# Altium PCB Tracker-NB-IOT-v1.1.PcbDoc (part 1 of 3)
Units mm, origin at the board's own origin, x right, y up, seen from the top; angles counter-clockwise.
Board outline 60 x 36.48 mm, 4 copper layers (Top Layer, Mid Layer 1, Mid Layer 2, Bottom Layer), stack 1.514 mm thick; 117 components, 86 nets, 443 pads, 352 vias.
Unrouted connection lines stored in the file: 3.
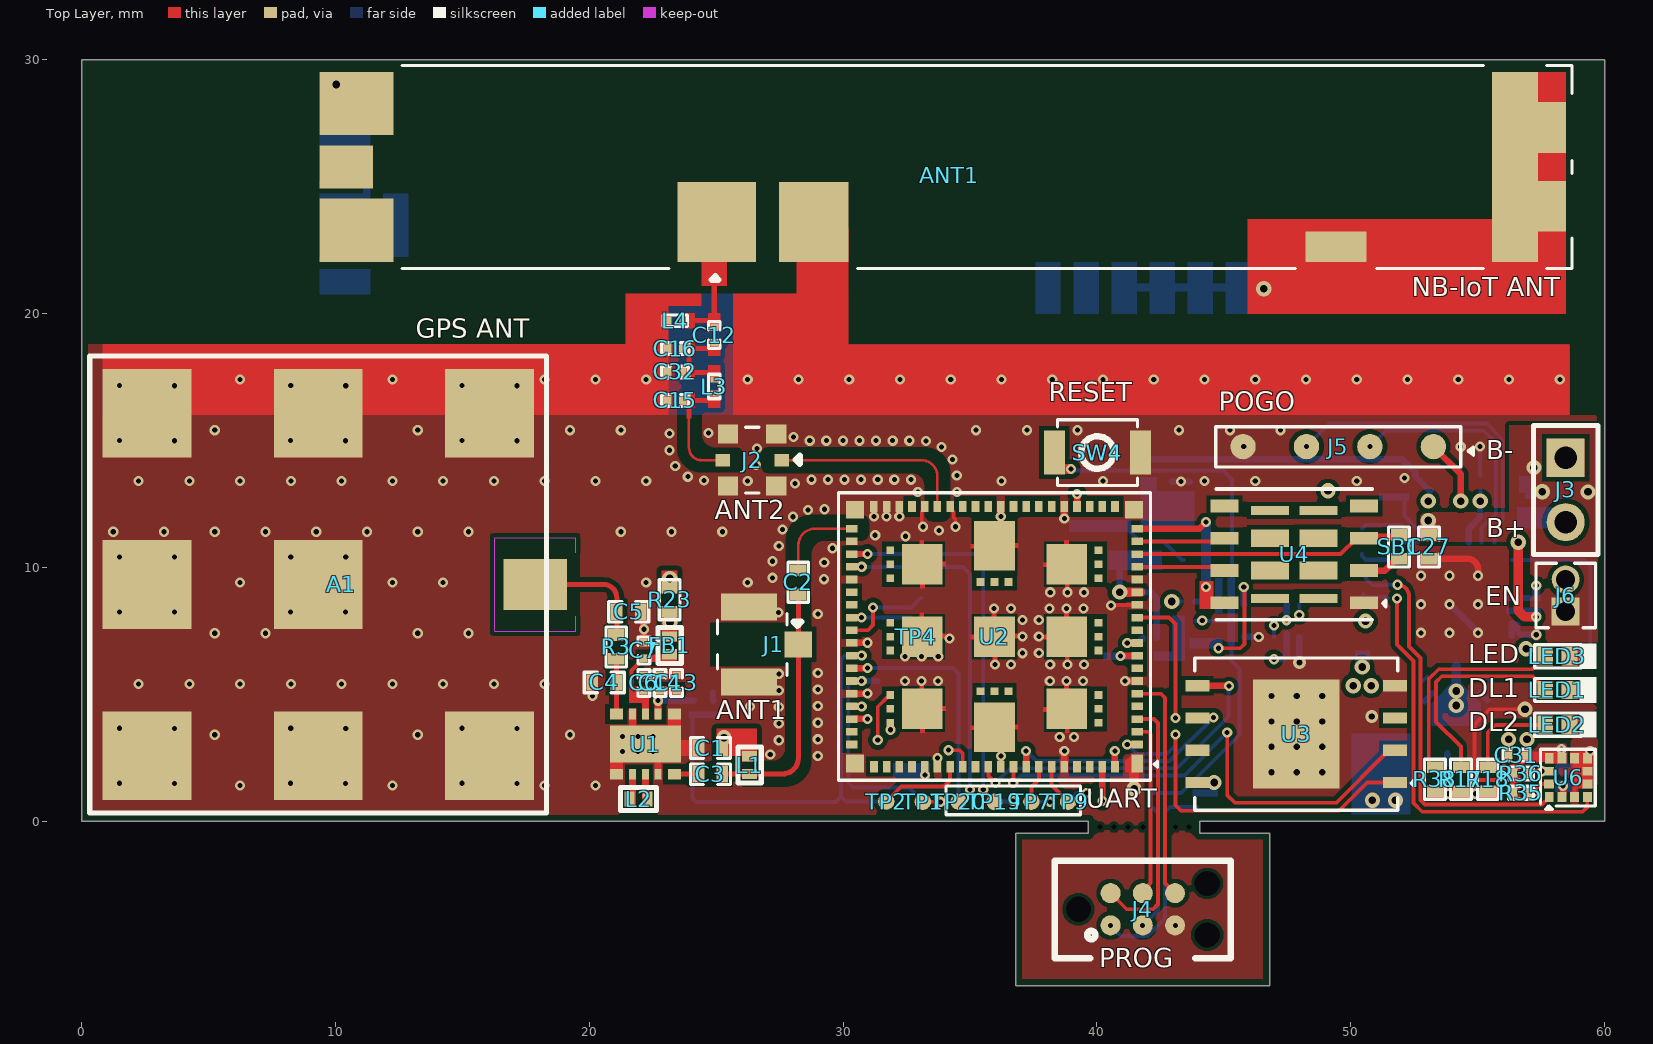
[diagram p0: Top Layer view]
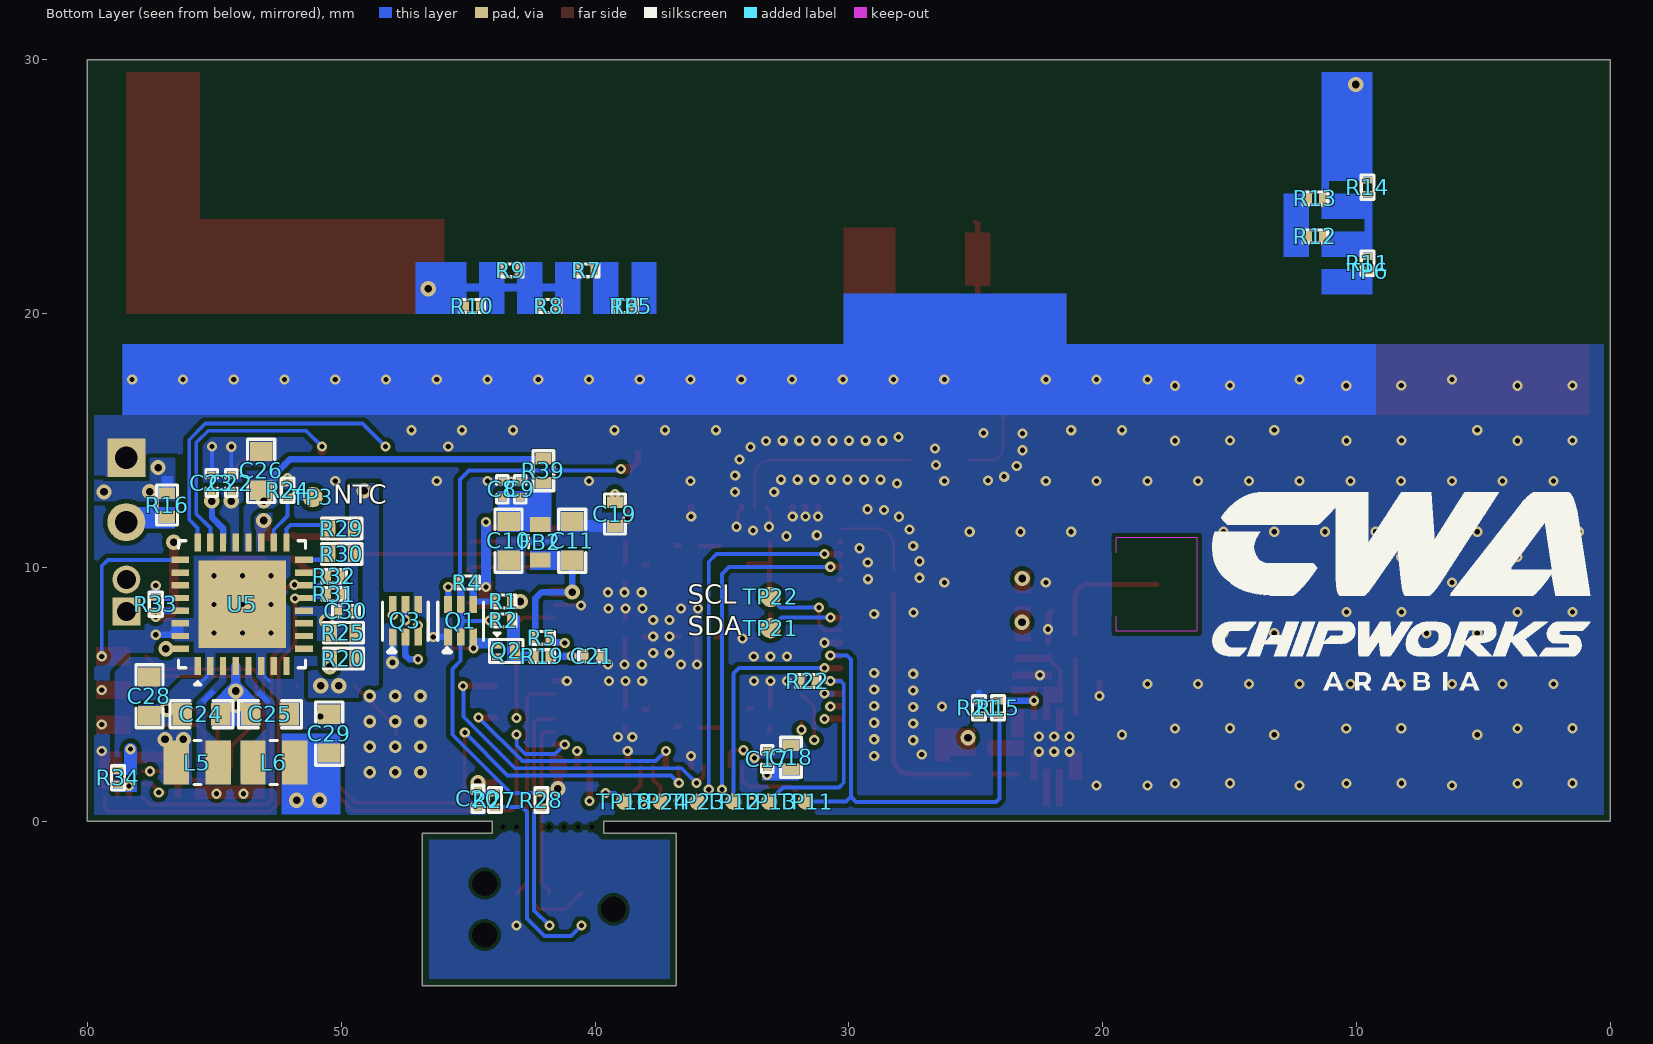
[diagram p1: Bottom Layer view, seen from below]
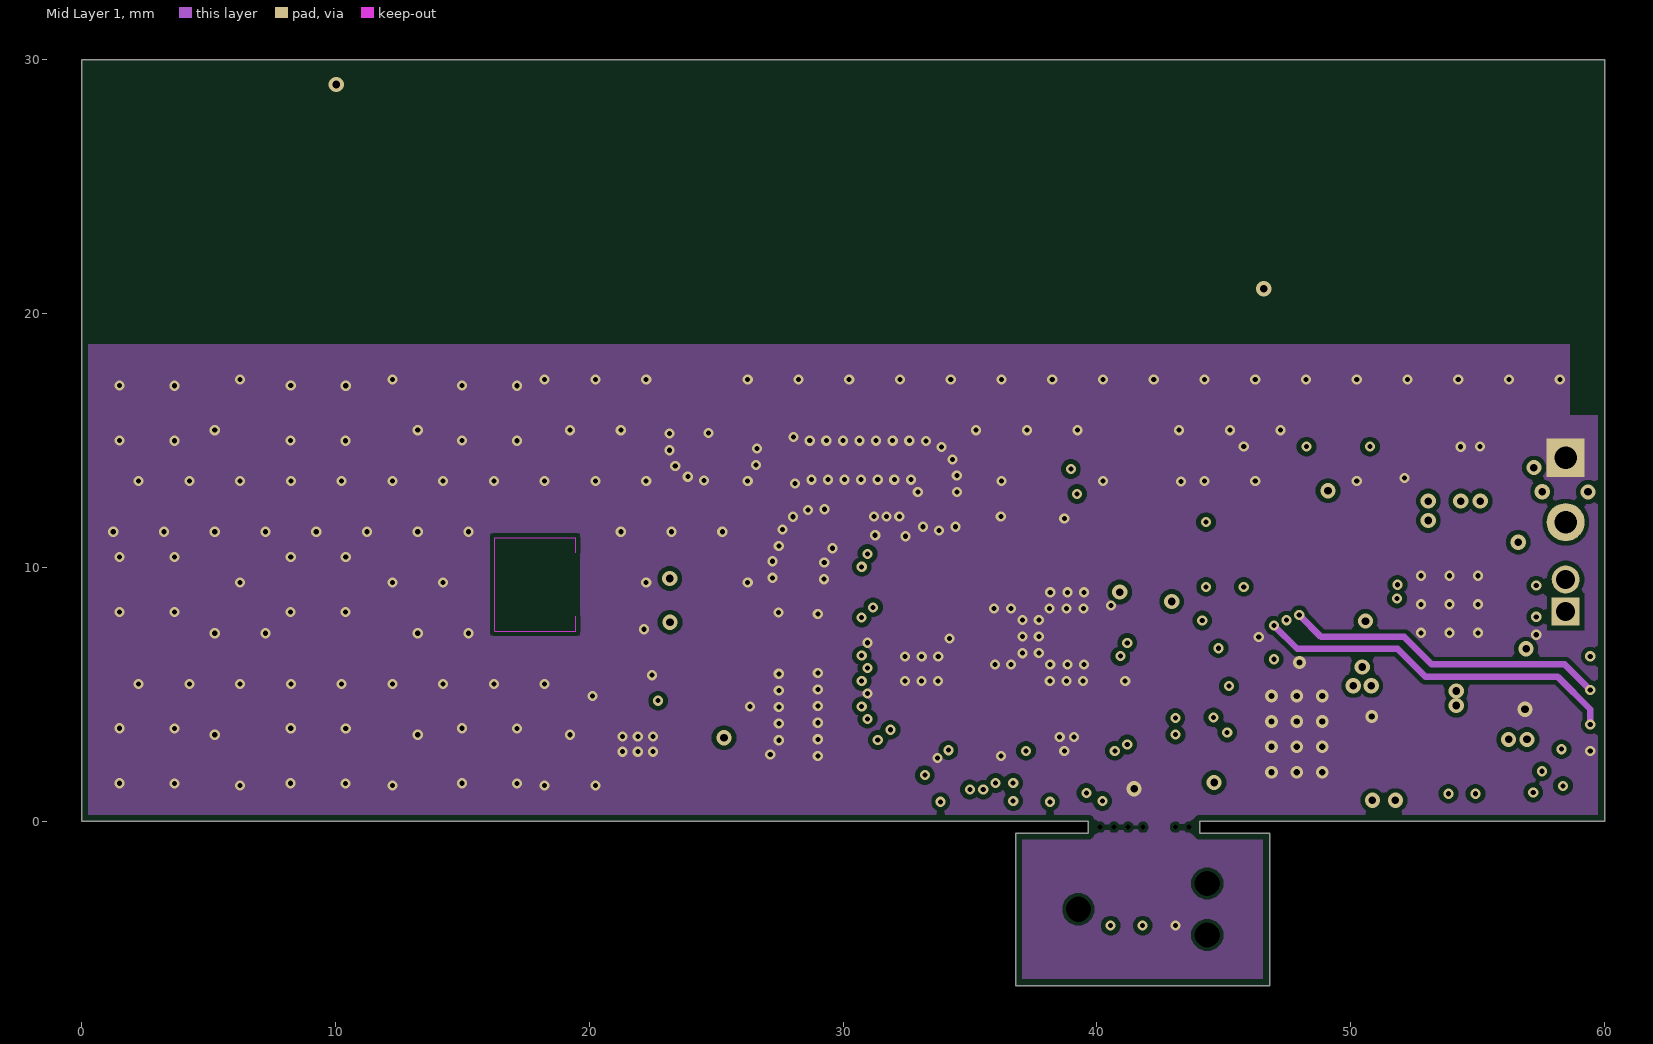
[diagram p2: Mid Layer 1]
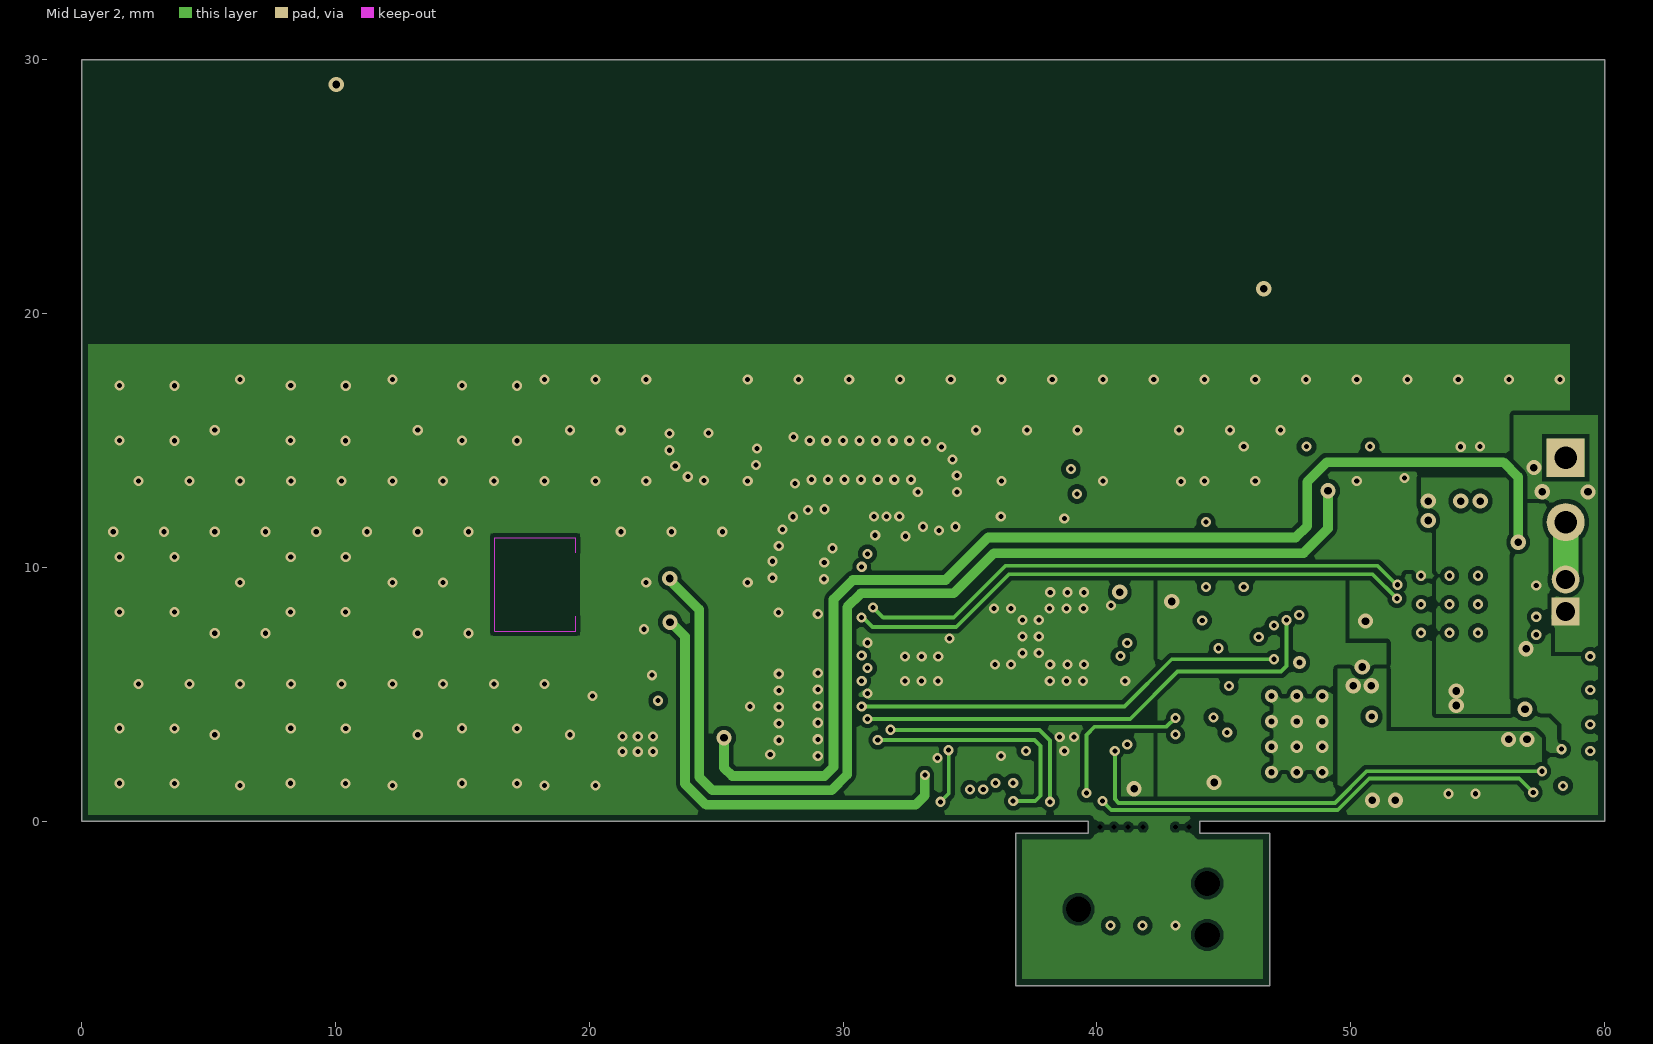
[diagram p3: Mid Layer 2]
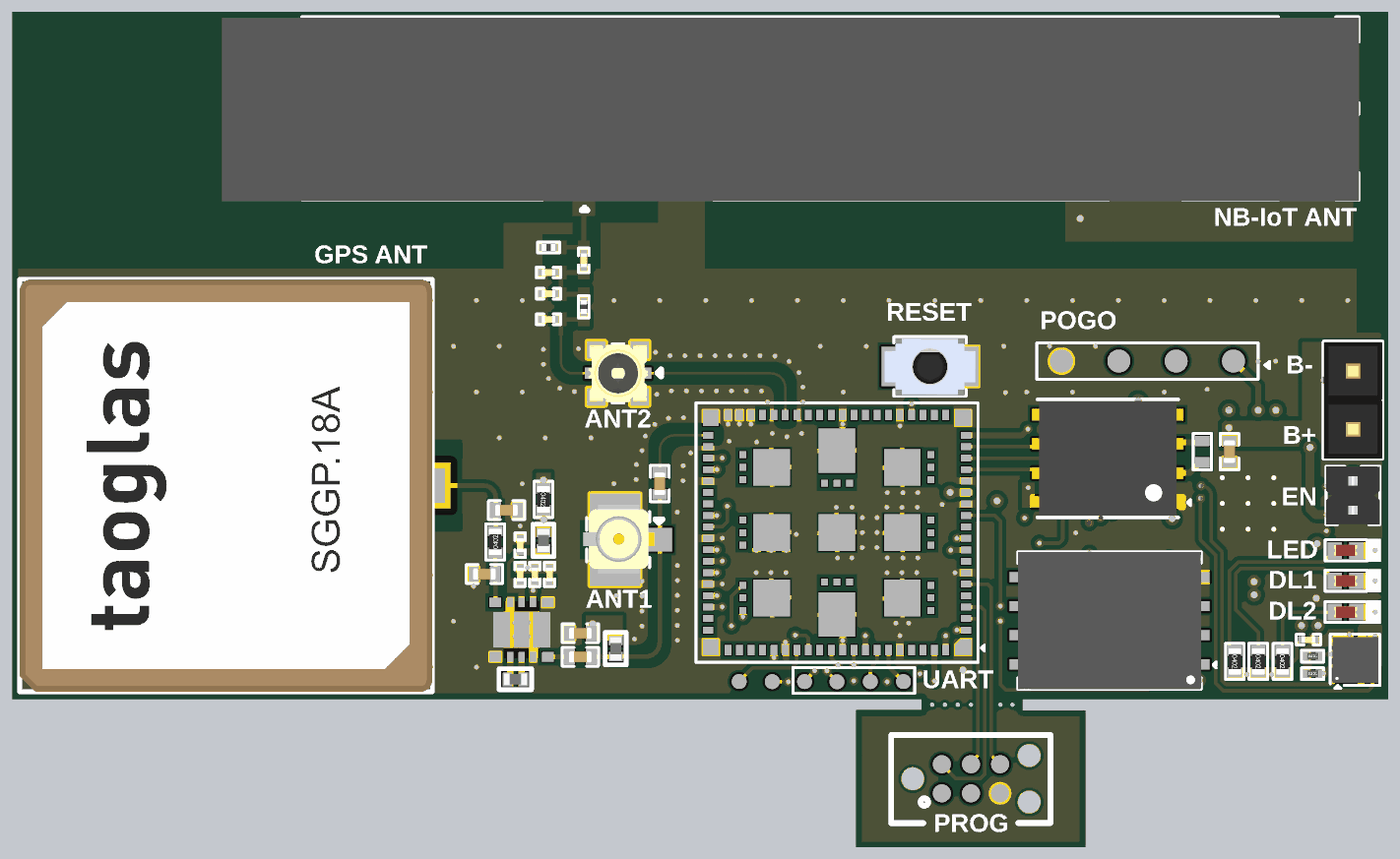
[diagram p5: 3D render of the assembled board from above, using the file's embedded part models]
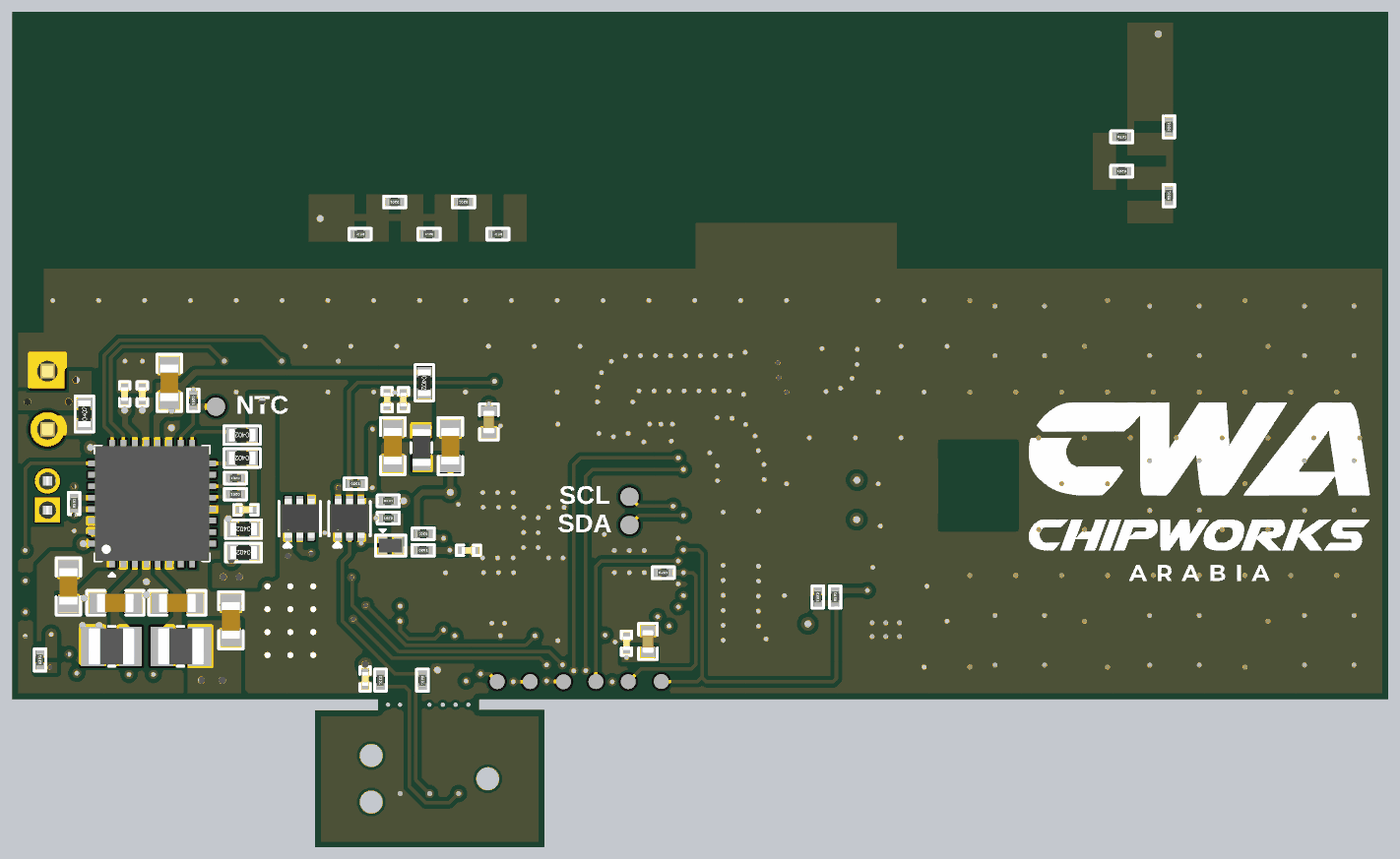
[diagram p6: 3D render of the assembled board from below, using the file's embedded part models]

## Layer stack, top to bottom
Top Solder: solder mask 0.05, Solder Resist, Dk 3.5
Top Layer: signal copper 0.035
Dielectric 2: prepreg 0.072, PP-006, Dk 4.1
Mid Layer 1: signal copper 0.035
Dielectric 1: dielectric 1.23, FR-4, Dk 4.8
Mid Layer 2: signal copper 0.035
Dielectric 3: prepreg 0.072, PP-006, Dk 4.1
Bottom Layer: signal copper 0.035
Bottom Solder: solder mask 0.05, Solder Resist, Dk 3.5

## Board outline
36.801,-6.477 36.801,-0.476 39.657,-0.476 39.657,0.002 0,0.002 0,30 60,30 60,0 44.055,0 44.055,-0.478 46.801,-0.478 46.801,-6.477

## Design rules (kind name [scope] priority, off if disabled: settings)
BoardOutlineClearance [All] p1: gap=0 ignorepadtopadclearanceinfootprint=FALSE except(0.254: Poly-OutlineEdge)
Clearance [All] p1: gap=0.127 ignorepadtopadclearanceinfootprint=FALSE except(0.178: Arc-Poly Track-Poly SMDPad-Poly THPad-Poly Via-Poly Fill-Poly Poly-Poly)
ComponentClearance [All] p1: gap=0 collisioncheckmode=3 verticalgap=0 showdistances=FALSE
MinimumSolderMaskSliver [All] p1: minsoldermaskwidth=0
PolygonConnect [All] p1: connectstyle=Direct reliefconductorwidth=0.254 reliefentries=4 polygonreliefangle="90 Angle" airgapwidth=0.254
RoutingVias [All] p1: holewidth=0.3 width=0.6 viastyle="Through Hole" minholewidth=0.2 minwidth=0.4 maxholewidth=0.3 maxwidth=0.6
ShortCircuit "R6 and R11 Voilation" [InComponent('R6')or InComponent('R11')] p1: allowed=TRUE
ShortCircuit [All] p2: allowed=FALSE
SilkToSilkClearance [All] p1: silktosilkclearance=0.127
SilkToSolderMaskClearance [IsPad] p1: minsilkscreentomaskgap=0 clearancetoexposedcopper=TRUE
SolderMaskExpansion [All] p1: expansion=0.102 istentingtop=FALSE soldermaskfromhole=TRUE
SupplyNets "Schematic Supply Nets_11" [InNet('VSYS')] p1: voltage=0.000
SupplyNets "Schematic Supply Nets_10" [InNet('VUSB')] p2: voltage=0.000
SupplyNets "Schematic Supply Nets_9" [InNet('VDD_IMCU')] p3: voltage=0.000
SupplyNets "Schematic Supply Nets_8" [InNet('VDD_1V8')] p4: voltage=0.000
SupplyNets "Schematic Supply Nets_7" [InNet('VDD_3V0')] p5: voltage=0.000
SupplyNets "Schematic Supply Nets_6" [InNet('VBUS')] p6: voltage=0.000
SupplyNets "Schematic Supply Nets_5" [InNet('VDD_GPIO')] p7: voltage=0.000
SupplyNets "Schematic Supply Nets_4" [InNet('GND')] p8: voltage=0.000
SupplyNets "Schematic Supply Nets_3" [InNet('VDD')] p9: voltage=0.000
SupplyNets "Schematic Supply Nets_2" [InNet('VDD_GNSS')] p10: voltage=0.000
SupplyNets "Schematic Supply Nets_1" [InNet('VDD_nRF')] p11: voltage=0.000
SupplyNets "Schematic Supply Nets" [InNet('VBAT')] p12: voltage=0.000
UnRoutedNet [All] p1: checkbadconnections=TRUE
Width RF_Lines [InNet('ANT') or InNet('LTE_RF1') or InNet('GPS_RF1')] p1: maxlimit=0.101 minlimit=0.077 preferedwidth=0.101 toplayer_minwidth=0.101 midlayer1_maxwidth=0.077 midlayer1_prefwidth=0.077 midlayer2_maxwidth=0.077 midlayer2_prefwidth=0.077 bottomlayer_minwidth=0.101 impedanceprofiledriven=TRUE impedanceprofileid={30CA258E-08FE-4689-83D6-7ECBA6ABAF34} impedanceprofilevalue=50.000000 minimp=50.000000 maximp=50.000000 favimp=50.000000
Width [All] p2: maxlimit=1.27 minlimit=0.152 preferedwidth=0.254 minimp=50.000000 maximp=50.000000 favimp=50.000000
24 further rules are at their usual default settings.

## Classes and differential pairs
net class RF_Lines: ANT GPS_RF1 GPS_RF2 GPS_RF3 GPS_RF4 GPS_RF5 LTE_RF1 NetANT1_1 NetC12_1

## Components (designator, comment, footprint, x,y, rotation, side; value= is the part's Value field where it differs from the comment)
A1 "DSGP.1575.18.4.A.02" DSGP.1575.18.4.A.02 17.864,9.326 r0 top
ANT1 "P822601" P822601 34.174,25.454 r0 top
C1 "39pF" Cap-0402 24.771,2.881 r0 top
C2 "39pF" Cap-0402 28.232,9.412 r270 top
C3 "39pF" Cap-0402 24.771,1.85 r0 top
C4 "DNP" Cap-0402 20.587,5.466 r180 top
C5 "DNP" Cap-0402 21.552,8.254 r0 top
C6 "100pF" CAP-0201 22.146,5.447 r270 top
C7 "100nF" CAP-0201 22.146,6.727 r270 top
C8 "1uF" CAP-0201 43.659,13.073 r270 bottom
C9 "1uF" CAP-0201 42.948,13.073 r270 bottom
C10 "10uF" Cap-0603 43.409,11.049 r90 bottom
C11 "10uF" Cap-0603 40.898,11.049 r270 bottom
C12 "3.5pF" CAP-0201 24.919,19.155 r90 top
C13 "100nF" CAP-0201 23.427,5.447 r270 top
C14 "100pF" CAP-0201 22.784,5.447 r270 top
C15 "DNP" CAP-0201 23.386,16.58 r0 top
C16 "DNP" CAP-0201 23.386,18.624 r0 top
C17 "100nF" CAP-0201 33.214,2.446 r270 bottom
C18 "4.7uF" Cap-0402 32.278,2.522 r270 bottom
C19 "4.7uF" Cap-0402 39.218,12.102 r90 bottom
C20 "100nF" CAP-0201 44.615,0.884 r90 bottom
C21 "100nF" CAP-0201 40.11,6.496 r0 bottom
C22 "1uF" CAP-0201 54.336,13.324 r270 bottom
C23 "1uF" CAP-0201 55.107,13.324 r270 bottom
C24 "10uF" Cap-0603 55.509,4.21 r180 bottom
C25 "10uF" Cap-0603 52.808,4.21 r0 bottom
C26 "10uF" Cap-0603 53.158,13.806 r270 bottom
C27 "4.7uF" Cap-0402 53.084,10.805 r90 top
C28 "10uF" Cap-0603 57.559,4.921 r90 bottom
C29 "10uF" Cap-0603 50.472,3.448 r270 bottom
C30 "100nF" CAP-0201 49.816,8.27 r0 bottom
C31 "100nF" CAP-0201 56.531,2.603 r0 top
C32 "DNP" CAP-0201 23.386,17.7 r0 top
FB1 "BLM15EX121SN1D" IND-0402 23.162,6.927 r90 top
FB2 "BLM18SD220SN1D" "IND-0603 (1608 Metric)" 42.16,10.987 r270 bottom
J1 "U.FL-R-SMT-1(80)" U.FL-R-SMT-1(80)_ 27.258,6.964 r90 top
J2 "MM8130-2600RA2" MM8130-2600RA2 26.416,14.224 r90 top
J3 "X6511WV-02H-C60D30" HDR1X2_ 58.471,14.321 r270 top
J4 "TC2030-IDC-NL" TC2030-IDC-NL_ 41.808,-3.471 r0 top
J5 "POGO Connector 4 Pin" "Pogo 4 Pin" 49.507,14.759 r180 top
J6 "1.27-1*2P" "HDR 1x2 Male 1.27mm" 58.471,8.89 r90 top
L1 "68nH" IND-0402 26.314,2.21 r90 top
L2 "9.1nH" IND-0402 21.936,0.873 r0 top
L3 "1.5nH" IND-0201 24.919,17.126 r90 top value=50mR
L4 "22nH" IND-0201 23.386,19.716 r0 top
L5 "2.2uH" IND-0806 55.679,2.31 r180 bottom
L6 "2.2uH" IND-0806 52.653,2.31 r0 bottom
LED1 "XZVG68W-2" LED-0402 58.143,5.169 r0 top
LED2 "RED" LED-0402 58.143,3.804 r0 top
LED3 "Red" LED-0402 58.143,6.496 r0 top
Q1 "DMC2400UV-7" SOT-563 45.296,7.891 r90 bottom
Q2 "RV2C010UNT2L" DFN1006-3 43.502,6.705 r270 bottom
Q3 "UM6X1NA-TP" SOT-563 47.47,7.891 r90 bottom locked
R1 "10K" Res-0201 43.605,8.656 r180 bottom
R2 "DNP" Res-0201 43.605,7.909 r0 bottom
R3 "0R" Res-0402 21.057,6.865 r90 top
R4 "100K" Res-0201 45.045,9.403 r180 bottom
R5 "10K" Res-0201 42.084,7.222 r0 bottom
R6 "0R" Res-0201 38.824,20.297 r0 bottom
R7 "0R" Res-0201 40.324,21.703 r0 bottom
R8 "0R" Res-0201 41.824,20.297 r0 bottom
R9 "0R" Res-0201 43.324,21.703 r0 bottom
R10 "0R" Res-0201 44.835,20.297 r0 bottom
R11 "0R" Res-0201 9.559,21.979 r90 bottom
R12 "0R" Res-0201 11.614,23.045 r0 bottom
R13 "0R" Res-0201 11.614,24.542 r180 bottom
R14 "0R" Res-0201 9.559,24.977 r90 bottom
R15 "1K" Res-0201 24.117,4.466 r90 bottom value=1kR
R16 "DNP" Res-0402 56.861,12.454 r90 bottom
R17 "120R" Res-0402 54.342,1.651 r270 top
R18 "120R" Res-0402 55.397,1.651 r270 top
R19 "1K" Res-0201 42.084,6.502 r180 bottom value=1kR
R20 "0R" Res-0402 49.918,6.404 r0 bottom
R21 "1M" Res-0201 24.873,4.466 r270 bottom value=1MR
R22 "1M" Res-0201 31.617,5.523 r180 bottom value=1MR
R23 "0R" Res-0402 23.162,8.724 r270 top
R24 "0R" Res-0201 52.112,13.044 r270 bottom
R25 "0R" Res-0402 49.918,7.424 r0 bottom
R27 "DNP" Res-0201 43.945,0.834 r270 bottom
R28 "0R" Res-0201 42.117,0.834 r270 bottom
R29 "47K" Res-0402 49.981,11.526 r0 bottom value=47kR
R30 "150K" Res-0402 49.981,10.524 r0 bottom
R31 "4.7K" Res-0201 50.274,8.948 r0 bottom
R32 "4.7K" Res-0201 50.274,9.651 r0 bottom
R33 "0R" Res-0201 57.309,8.545 r90 bottom
R34 "100K" Res-0201 58.795,1.716 r90 bottom
R35 "4.7K" Res-0201 56.709,1.117 r0 top
R36 "4.7K" Res-0201 56.709,1.878 r0 top
R38 "120R" Res-0402 53.318,1.651 r270 top
R39 "0R" Res-0402 42.033,13.81 r270 bottom
SB1 "Solder Bridge 0402" "Solder Bridge 0402" 51.9,10.805 r90 top
SW4 "B3U-1000P" B3U-1000P 40.022,14.525 r0 top
TP1 "TEST POINT 0.5mm Dia" "Test-point - 0.5mm"#1 33.14,0.768 r270 top
TP2 "TEST POINT 0.5mm Dia" "Test-point - 0.5mm"#1 31.698,0.773 r270 top
TP3 "TEST POINT 0.5mm Dia" "Test-point - 0.5mm"#2 51.123,12.769 r0 bottom
TP4 "TEST POINT 0.5mm Dia" "Test-point - 0.5mm"#2 32.863,7.269 r180 top
TP5 "TEST POINT 0.5mm Dia" "Test-point - 0.5mm"#3 34.028,24.685 r270 bottom
TP6 "TEST POINT 0.5mm Dia" "Test-point - 0.5mm"#4 39.87,24.685 r270 bottom
TP7 "TEST POINT 0.5mm Dia" "Test-point - 0.5mm"#1 37.418,0.771 r270 top
TP9 "TEST POINT 0.5mm Dia" "Test-point - 0.5mm"#1 38.864,0.772 r270 top
TP11 "TEST POINT 0.5mm Dia" "Test-point - 0.5mm"#1 31.698,0.773 r0 bottom
TP12 "TEST POINT 0.5mm Dia" "Test-point - 0.5mm"#1 34.55,0.771 r0 bottom
TP13 "TEST POINT 0.5mm Dia" "Test-point - 0.5mm"#1 33.14,0.768 r0 bottom
TP18 "TEST POINT 0.5mm Dia" "Test-point - 0.5mm"#1 38.852,0.768 r270 bottom
TP19 "TEST POINT 0.5mm Dia" "Test-point - 0.5mm"#1 35.963,0.762 r270 top
TP20 "TEST POINT 0.5mm Dia" "Test-point - 0.5mm"#1 34.55,0.771 r270 top
TP21 "TEST POINT 0.5mm Dia" "Test-point - 0.5mm"#2 33.084,7.602 r90 bottom
TP22 "TEST POINT 0.5mm Dia" "Test-point - 0.5mm"#2 33.084,8.835 r90 bottom
TP23 "TEST POINT 0.5mm Dia" "Test-point - 0.5mm"#1 35.963,0.762 r180 bottom
TP24 "TEST POINT 0.5mm Dia" "Test-point - 0.5mm"#1 37.418,0.771 r180 bottom
U1 "SKY65943-11" "10-MCM (2.5x2.5)" 22.208,3.038 r270 top
U2 "NRF9151-LACA-R" NRF9151-LACA-R 35.963,7.273 r180 top locked value=nRF9151-LACAA0A
U3 "GD25WB256EYIGY" "8-WSON (8x6)" 47.854,3.429 r180 top
U4 "MFFX-M2M UICC" MFFX 47.775,10.51 r180 top
U5 "NPM1300-QEAA-R" "32-QFN (5x5)" 53.908,8.545 r90 bottom locked
U6 "LIS2DH12TR" "12-LGA (2x2)" 58.572,1.718 r90 top

## Footprints (in the part's own frame and the unit in brackets; to place one, negate y for a bottom-side part, rotate by r counter-clockwise, add the part's x,y. Pads: shape width x height; smd on the part's side, far side on the other; paste and mask are expansions set on the pad)
"8-WSON (8x6)" [mm]
  rect 0.94x0.44 smd: 1(-3.895,1.905) 2(-3.895,0.635) 3(-3.895,-0.635) 4(-3.895,-1.905) 5(3.895,-1.905) 6(3.895,-0.635) 7(3.895,0.635) 8(3.895,1.905)
  rect 3.4x4.3 smd paste-3: 9(0,0)
  silkscreen extent -4.65,-3 4,3, body extent -4,-3 4,3, height 0.8
"10-MCM (2.5x2.5)" [mm]
  rect 0.425x0.515 smd mask+0.05: 1(-1.187,1.144) 5(-1.187,-1.144) 6(1.188,-1.144) 10(1.188,1.144)
  rect 0.425x0.275 smd mask+0.05: 2(-1.187,0.5) 3(-1.187,0) 4(-1.187,-0.5) 7(1.188,-0.5) 8(1.188,0) 9(1.188,0.5)
  rect 1.45x2.802 smd paste-2 mask-5: 11(0,0)
  rect 2.487x1.55 on Top Solder: ""(0,0)
  Top Layer region: -0.988,0.888 -0.713,0.888 -0.713,1.401 -0.988,1.401
  Top Layer region: 0.712,-1.399 0.987,-1.399 0.987,-0.887 0.712,-0.887
  Top Layer region: 0.712,0.363 0.987,0.363 0.987,0.638 0.712,0.638
  Top Layer region: -0.713,-0.362 -0.988,-0.362 -0.988,-0.637 -0.713,-0.637
  body extent -1.25,-1.25 1.25,1.25, height 0.7
"12-LGA (2x2)" [mm]
  rect 0.4x0.35 smd: 1(-0.76,0.75) 2(-0.76,0.25) 3(-0.76,-0.25) 4(-0.76,-0.75) 7(0.76,-0.75) 8(0.76,-0.25) 9(0.76,0.25) 10(0.76,0.75)
  rect 0.35x0.4 smd: 5(-0.25,-0.76) 6(0.25,-0.76) 11(0.25,0.76) 12(-0.25,0.76)
  silkscreen extent -1.24,-1.07 1.12,1.09, body extent -1,-1 1,1, height 0.7
"32-QFN (5x5)" [mm]
  rect 0.7x0.25 smd: 1(-2.435,1.75) 2(-2.435,1.25) 3(-2.435,0.75) 4(-2.435,0.25) 5(-2.435,-0.25) 6(-2.435,-0.75) 7(-2.435,-1.25) 8(-2.435,-1.75) 17(2.435,-1.75) 18(2.435,-1.25) 19(2.435,-0.75) 20(2.435,-0.25) 21(2.435,0.25) 22(2.435,0.75) 23(2.435,1.25) 24(2.435,1.75)
  rect 0.25x0.7 smd: 9(-1.75,-2.435) 10(-1.25,-2.435) 11(-0.75,-2.435) 12(-0.25,-2.435) 13(0.25,-2.435) 14(0.75,-2.435) 15(1.25,-2.435) 16(1.75,-2.435) 25(1.75,2.435) 26(1.25,2.435) 27(0.75,2.435) 28(0.25,2.435) 29(-0.25,2.435) 30(-0.75,2.435) 31(-1.25,2.435) 32(-1.75,2.435)
  rect 3.45x3.45 smd paste-3: 33(0,0)
  silkscreen extent -3.17,-2.5 2.5,2.5, body extent -2.5,-2.5 2.5,2.5, height 0.6
B3U-1000P [mm] "SWITCH TACTILE SPST-NO 0.05A 12V"
  rect 0.82x1.72 smd: 1(-1.7,0) 2(1.7,0)
  silkscreen extent -1.57,-1.3 1.57,1.3, body extent -2,-1.26 2,1.24, height 1.6
CAP-0201 [mm]
  rect 0.3x0.3 smd mask+0.055: 1(-0.3,0) 2(0.3,0)
  silkscreen extent -0.53,-0.23 0.53,0.23, body extent -0.3,-0.15 0.3,0.15, height 0.28
Cap-0402 [mil]
  rect 18x25 smd mask+2.36: 1(-18.5,0) 2(18.5,0)
  silkscreen extent -31,-16 31,16, body extent -20,-10 20,10, height 19
Cap-0603 [mil]
  rect 30x35 smd mask+2.36: 1(-30,0) 2(30,0)
  silkscreen extent -49,-21 49,21, body extent -32,-16 31,16, height 34
DFN1006-3 [mm]
  rect 0.25x0.4 smd: 1(-0.225,-0.35) 2(0.225,-0.35)
  rect 0.7x0.4 smd: 3(0,0.35)
  silkscreen extent -0.71,-0.66 0.46,0.66, body extent -0.3,-0.5 0.3,0.5, height 0.53
DSGP.1575.18.4.A.02 [mm]
  rect 2.5x2 smd paste-0.25 mask+0.3: 1(0,0)
  rect 3.5x3.5 smd paste-0.6 mask+0.1: 2(-15.3,-6.75) 2(-15.3,0) 2(-15.3,6.75) 2(-8.55,-6.75) 2(-8.55,0) 2(-8.55,6.75) 2(-1.8,-6.75) 2(-1.8,6.75)
  Keep-Out Layer lines w0.01: 1.59,-1.26 1.59,-1.84 -1.59,-1.84 -1.59,1.84 1.59,1.84 1.59,1.26
  Multi-Layer pour cut-out: -1.75,-2 1.75,-2 1.75,2 -1.75,2
  silkscreen extent -17.55,-9 0.45,9, body extent -17.55,-9 0.46,9, height 4.02
HDR1X2_ [mm] "CONN HEADER VERT 2POS 2.54MM"
  rect 1.5x1.5 hole 0.9: 1(0,0)
  round 1.5 hole 0.9: 2(2.54,0)
  silkscreen extent -1.27,-1.27 3.81,1.27, body extent -1.27,-1.27 3.81,1.27, height 8.44
"HDR 1x2 Male 1.27mm" [mm]
  rect 1.1x1.1 hole 0.75 paste-2539.97 mask+0.051: 1(-0.635,0)
  round 1.1 hole 0.75 paste-2539.97 mask+0.051: 2(0.635,0)
  silkscreen extent -1.27,-1.18 1.27,1.18, body extent -1.27,-1.17 1.28,1.17, height 5.6
IND-0201 [mm]
  rect 0.25x0.3 smd mask+0.055: 1(-0.275,0) 2(0.275,0)
  silkscreen extent -0.48,-0.23 0.48,0.23, body extent -0.3,-0.15 0.3,0.15, height 0.15
IND-0402 [mm]
  rect 0.4x0.6 smd: 1(-0.35,0) 2(0.35,0)
  silkscreen extent -0.71,-0.46 0.71,0.46, body extent -0.5,-0.25 0.5,0.25, height 0.25
"IND-0603 (1608 Metric)" [mm] "0.063\" L x 0.032\" W (1.60mm x 0.80mm)"
  rect 0.6x0.8 smd: 1(-0.7,0) 2(0.7,0)
  silkscreen extent -0.2,-0.46 0.23,0.46, body extent -0.8,-0.4 0.8,0.4, height 0.78
IND-0806 [mm]
  rect 1x1.72 smd: 1(-0.825,0) 2(0.825,0)
  silkscreen extent -0.13,-0.86 0.15,0.86, body extent -1,-0.8 1,0.8, height 1.2
LED-0402 [mm]
  rect 0.62x0.72 smd: 1(-0.475,0) 2(0.475,0)
  silkscreen extent -0.89,-0.51 1.55,0.51, body extent -0.5,-0.25 0.51,0.25, height 0.45
MFFX [mm]
  rect 1.5x0.35 smd paste-1.27: 0(-0.95,1.73) 0(-0.95,-1.73) 0(0.95,1.73) 0(0.95,-1.73)
  rect 1.5x0.7 smd paste-1.27: 0(-0.95,-0.635) 0(-0.95,0.635) 0(0.95,-0.635) 0(0.95,0.635)
  rect 1.1x0.5 smd paste-1.27: 1(-2.75,1.905) 2(-2.75,0.635) 3(-2.75,-0.635) 4(-2.75,-1.905) 5(2.75,-1.905) 6(2.75,-0.635) 7(2.75,0.635) 8(2.75,1.905)
  silkscreen extent -3.61,-2.58 3.08,2.58, body extent -3,-2.5 3,2.5, height 0.65
MM8130-2600RA2 [mm]
  rect 0.5x0.58 smd: 1(0,-1.16) 2(0,1.16)
  rect 0.75x0.8 smd: 3(-1.025,-0.95) 3(-1.025,0.95) 3(1.025,-0.95) 3(1.025,0.95)
  silkscreen extent -1.3,-1.87 1.3,0.25, body extent -1.25,-1.3 1.25,1.3, height 1.4
NRF9151-LACA-R [mm]
  rect 0.45x0.7 smd paste-2539.97 mask-5: 1(-5.625,5)
  rect 0.45x0.3 smd mask+0.05: 2(-5.625,4.25) 3(-5.625,3.75) 4(-5.625,3.25) 5(-5.625,2.75) 6(-5.625,2.25) 7(-5.625,1.75) 8(-5.625,1.25) 9(-5.625,0.75) 10(-5.625,0.25) 11(-5.625,-0.25) 12(-5.625,-0.75) 13(-5.625,-1.25) 14(-5.625,-1.75) 15(-5.625,-2.25) 16(-5.625,-2.75) 17(-5.625,-3.25) 18(-5.625,-3.75) 19(-5.625,-4.25) 42(5.625,-4.25) 43(5.625,-3.75) 44(5.625,-3.25) 45(5.625,-2.75) 46(5.625,-2.25) 47(5.625,-1.75) 48(5.625,-1.25) 49(5.625,-0.75) 50(5.625,-0.25) 51(5.625,0.25) 52(5.625,0.75) 53(5.625,1.25) 54(5.625,1.75) 55(5.625,2.25) 56(5.625,2.75) 57(5.625,3.25) 58(5.625,3.75) 59(5.625,4.25)
  rect 0.7x0.7 smd mask+0.05: 20(-5.5,-5) 41(5.5,-5) 60(5.5,5)
  rect 0.3x0.45 smd mask+0.05: 21(-4.75,-5.125) 22(-4.25,-5.125) 23(-3.75,-5.125) 24(-3.25,-5.125) 25(-2.75,-5.125) 26(-2.25,-5.125) 27(-1.75,-5.125) 28(-1.25,-5.125) 29(-0.75,-5.125) 30(-0.25,-5.125) 31(0.25,-5.125) 32(0.75,-5.125) 33(1.25,-5.125) 34(1.75,-5.125) 35(2.25,-5.125) 36(2.75,-5.125) 37(3.25,-5.125) 38(3.75,-5.125) 39(4.25,-5.125) 40(4.75,-5.125) 61(4.75,5.125) 62(4.25,5.125) 63(3.75,5.125) 64(3.25,5.125) 65(2.75,5.125) 66(2.25,5.125) 67(1.75,5.125) 68(1.25,5.125) 69(0.75,5.125) 70(0.25,5.125) 71(-0.25,5.125) 72(-0.75,5.125) 73(-1.25,5.125) 74(-1.75,5.125) 75(-2.25,5.125) 76(-2.75,5.125) 77(-3.25,5.125) 78(-3.75,5.125) 79(-4.25,5.125) 80(-4.75,5.125)
  rect 0.3x0.3 smd mask+0.05: 81(-4.1,3.4) 82(-4.1,2.85) 83(-4.1,2.3) 84(-4.1,0.55) 85(-4.1,0) 86(-4.1,-0.55) 87(-4.1,-2.3) 88(-4.1,-2.85) 89(-4.1,-3.4) 90(-0.55,-2.15) 91(0,-2.15) 92(0.55,-2.15) 93(4.1,-3.4) 94(4.1,-2.85) 95(4.1,-2.3) 96(4.1,-0.55) 97(4.1,0) 98(4.1,0.55) 99(4.1,2.3) 100(4.1,2.85) 101(4.1,3.4) 102(0.55,2.15) 103(0,2.15) 104(-0.55,2.15)
  rect 1.6x1.6 smd mask+0.05: 105(-2.85,2.85) 106(-2.85,0) 107(-2.85,-2.85) 109(2.85,-2.85) 110(2.85,0) 111(2.85,2.85) 113(0,0)
  rect 1.6x1.95 smd mask+0.05: 108(0,-3.575) 112(0,3.575)
  Top Layer region: -5.15,5.35 -5.85,5.35 -5.85,4.65 -5.4,4.65 -5.15,4.9
  silkscreen extent -6.43,-5.66 6.15,5.66, body extent -6.1,-5.6 6.1,5.6, height 1.21
P822601 [mm]
  rect 3.1x3.15 smd: 1(-9.15,-1.85)
  rect 2.73x3.15 smd: 2(-5.335,-1.85)
  rect 2.4x1.2 smd: 4(15.25,-2.825)
  rect 1.8x7.5 smd: 4(22.3,0.325)
  rect 1.1x2 smd: 4(23.75,-1.225) 4(23.75,1.875)
  rect 2.9x2.5 smd: 5(-23.35,2.825) 7(-23.35,-2.175)
  rect 2.1x1.7 smd: 6(-23.75,0.325)
  silkscreen extent -21.55,-4.11 24.55,4.33, body extent -25.04,-3.72 24.56,4.28, height 3.52
"Pogo 4 Pin" [mm]
  round 1 smd: 1(-3.75,0) 2(-1.25,0) 3(1.25,0) 4(3.75,0)
  silkscreen extent -4.83,-0.79 4.83,0.8
Res-0201 [mm]
  rect 0.27x0.37 smd mask+0.055: 1(-0.275,0) 2(0.275,0)
  silkscreen extent -0.48,-0.25 0.48,0.25, body extent -0.3,-0.15 0.3,0.15, height 0.29
Res-0402 [mil]
  rect 18x25 smd mask+2.17: 1(-18.5,0) 2(18.5,0)
  silkscreen extent -32,-17 32,16, body extent -23,-11 23,11, height 16
"Solder Bridge 0402" [mil]
  rect 18x25 smd mask+2.17: 1(-18.5,0) 2(18.5,0)
  silkscreen extent -32,-17 32,16
SOT-563 [mm]
  rect 0.67x0.3 smd mask+0.07: 1(-0.638,0.5) 2(-0.638,0) 3(-0.638,-0.5) 4(0.638,-0.5) 5(0.638,0) 6(0.638,0.5)
  silkscreen extent -1.22,-0.9 0.74,0.9, body extent -0.85,-0.85 0.85,0.85, height 0.61
TC2030-IDC-NL_ [mil]
  round 30.98 smd: 1(-50,-25) 1(-50,-25) 2(-50,25) 3(0,-25) 4(0,25) 5(50,-25) 6(50,25)
  round 0 hole 39.02: MP1(-100,0) MP2(100,40) MP3(100,-40)
  silkscreen extent -137,-76 136,75
"Test-point - 0.5mm"#1 [mm]
  round 0.65 smd: 1(0,0)
"Test-point - 0.5mm"#2 [mm]
  round 0.8 smd: 1(0,0)
"Test-point - 0.5mm"#3 [mm]
  rect 0.37x0.27 smd: 1(4.387,-4.521)
"Test-point - 0.5mm"#4 [mm]
  rect 0.27x0.37 smd: 1(3.01,30.311)
U.FL-R-SMT-1(80)_ [mm]
  rect 1.02x1.07 smd: 1(0,-0.974)
  rect 1.07x2.2 smd: 2(1.475,0.974) 3(-1.475,0.974)
  silkscreen extent -1.22,-1.09 1.22,2.21, body extent -1.47,-0.74 1.53,2.36, height 1.2

## Part data
A1: "GPS SMT PATCH ANTENNA", Manufacturer=Taoglas, Manufacturer Part Number=DSGP.1575.18.4.C.02, Part number NEMS=100700073, Author=rubr, Component Status=Active, ComponentLink1Description=Datasheet, ComponentLink1URL=https://www.taoglas.com/datasheets/DSGP.1575.18.4.A.02.pdf, ComponentLink2Description="Supplier link", ComponentLink2URL=https://www.digikey.com/product-detail/en/taoglas-limited/DSGP.1575.18.4.A.02/931-1511-1-ND/8275289, Item Type=ANTENNA, PartId=100700073
ANT1: "RF ANT 700MHZ/750MHZ FLAT BAR", Clock Frequency=2.7GHz, Manufacturer=AVX, Max Operating Temperature=85°C, Min Operating Temperature=-40°C, Power Rating=2W, ComponentLink1Description=http://www.farnell.com/datasheets/2620174.pdf?src-supplier=Farnell, ComponentLink1URL=http://www.farnell.com/datasheets/2620174.pdf?src-supplier=Farnell, ComponentLink2Description=http://www.farnell.com/datasheets/2620174.pdf?src-supplier=Newark, ComponentLink2URL=http://www.farnell.com/datasheets/2620174.pdf?src-supplier=Newark, ComponentLink3Description=http://www.farnell.com/datasheets/2620174.pdf?src-supplier=Element14, ComponentLink3URL=http://www.farnell.com/datasheets/2620174.pdf?src-supplier=Element14, ComponentLink4Description=https://datasheet.octopart.com/P822601-KYOCERA-AVX-datasheet-165822267.pdf?src-supplier=Future+Electronics, ComponentLink4URL=https://datasheet.octopart.com/P822601-KYOCERA-AVX-datasheet-165822267.pdf?src-supplier=Future+Electronics, Frequency=2.7GHz, Gain=3.4dB, Height=3.5mm, Impedance=50R, Item Type="RF Antennas", Manufacturer Part Number=P822601, Number of Bands=3NUMBER, Pricing="1=5.7, 10=3.826, 25=3.3392, 100=2.7938 (USD)", RoHS=Yes, Stock=7895, Supplier=Digikey
C1 C2 C3 C4 C5: library part CC0402FRNPO9BN390, "CAP CER 39PF 50V C0G/NPO 0402", LCSC Part Number=C327068, Manufacturer=Yageo, Supplier Part Number=7829161, Category="Ceramic Capacitors", ComponentLink1Description=https://datasheet.ciiva.com/26936/getdatasheetpartid-403444-26936051.pdf?src-supplier=Verical, ComponentLink1URL=https://datasheet.ciiva.com/26936/getdatasheetpartid-403444-26936051.pdf?src-supplier=Verical, ComponentLink2Description=https://datasheet.ciiva.com/11587/upy-gp-np0-16v-to-50v-8-11587062.pdf?src-supplier=Avnet, ComponentLink2URL=https://datasheet.ciiva.com/11587/upy-gp-np0-16v-to-50v-8-11587062.pdf?src-supplier=Avnet, Item Type=Capacitor, Manufacturer Part Number=CC0402FRNPO9BN390, Pricing="10000=0.0077, 30000=0.0074, 50000=0.0072, 150000=0.0069, 250000=0.0067 (USD)", RoHS=Yes, Stock=40000, Supplier="Future Electronics"
C6 C14: library part CC0201GRNPO9BN101, "CAP CER 100PF 50V C0G/NPO 0201", LCSC Part Number=C541242, Manufacturer=Yageo, Item Type=Capacitors, Manufacturer Part Number=CC0201GRNPO9BN101, Pricing="1=0.1, 10=0.027, 50=0.0156, 100=0.0122, 500=0.00916, 1000=0.00719, 2500=0.00654, 5000=0.00602 (USD)", RoHS=No, Stock=97329, Supplier=Digikey
C7 C13 C17 C20 C21 C30 C31: library part CC0201KRX5R6BB104, "CAP CER 0.1UF 10V X5R 0201", Case Code (Imperial)=0201, Case Code (Metric)=0603, Dielectric=X5R, LCSC Part Number=C190183, Manufacturer=Yageo, Max Operating Temperature=85°C, Min Operating Temperature=-55°C, Resistor Type=Ceramic, Supplier Part Number 1=603-CC201KRX5R6BB104, Tolerance=10%, Voltage Rating=10V, Capacitance=100nF, Case/Package=0201, Category="Ceramic Capacitors", ComponentLink1Description=https://datasheet.ciiva.com/11587/upy-gphc-x5r-4v-to-50v-12-11587190.pdf?src-supplier=Avnet, ComponentLink1URL=https://datasheet.ciiva.com/11587/upy-gphc-x5r-4v-to-50v-12-11587190.pdf?src-supplier=Avnet, Construction=Flat, Depth=0.3mm, Halogen Free="Halogen Free", Height=0.3mm, Lead Free="Lead Free", Length=0.6mm, Manufacturer Part Number=CC0201KRX5R6BB104, Mount="Surface Mount", Packaging="Tape and Reel", Pricing 1="1=0.10000, 10=0.02400, 50=0.02400, 100=0.01900, 1000=0.01100, 10000=0.00900 (USD)", Radiation Hardening=No, RoHS=Yes, RoHS Compliant=Yes, Series=CC, Stock 1=824403, Supplier 1=Mouser, Termination=SMD/SMT, Thickness=0.013inch, Voltage Rating (DC)=10V, Weight=6E-06oz, Width=0.012inch
C8 C9 C22 C23: library part CC0201MRX5R6BB105, "CAP CER 1UF 10V X5R 0201", LCSC Part Number=C605210, Manufacturer=Yageo, Supplier Part Number=311-3474-1-ND, Category="Ceramic Capacitors", ComponentLink1Description=https://datasheet.octopart.com/CC0201MRX5R6BB105-Yageo-datasheet-158238148.pdf?src-supplier=Farnell, ComponentLink1URL=https://datasheet.octopart.com/CC0201MRX5R6BB105-Yageo-datasheet-158238148.pdf?src-supplier=Farnell, ComponentLink2Description=http://www.yageo.com/documents/recent/UPY-GPHC_X5R_4V-to-50V_25.pdf?src-supplier=Digi-Key, ComponentLink2URL=http://www.yageo.com/documents/recent/UPY-GPHC_X5R_4V-to-50V_25.pdf?src-supplier=Digi-Key, ComponentLink3Description=https://datasheet.octopart.com/CC0201MRX5R6BB105-Yageo-datasheet-137700082.pdf?src-supplier=Future+Electronics, ComponentLink3URL=https://datasheet.octopart.com/CC0201MRX5R6BB105-Yageo-datasheet-137700082.pdf?src-supplier=Future+Electronics, Item Type=Capacitor, Manufacturer Part Number=CC0201MRX5R6BB105, Pricing="1=0.19, 10=0.135, 50=0.0764, 100=0.0633, 500=0.04436, 1000=0.03672, 2500=0.03418, 5000=0.03127 (USD)", RoHS=Yes, Stock=772400, Supplier=Digi-Key
C10 C11 C24 C25 C26 C28 C29: library part GRM188Z71A106KA73D, "CAP CER 10UF 10V X7R 0603", Case/Package=345Case, LCSC Part Number=C2959727, Manufacturer=Murata, Max Operating Temperature=125°C, Min Operating Temperature=-55°C, Tolerance=10%, Voltage Rating=10V, ComponentLink1Description=https://datasheet.octopart.com/GRM188Z71A106KA73D-Murata-datasheet-165579666.pdf?src-supplier=TME, ComponentLink1URL=https://datasheet.octopart.com/GRM188Z71A106KA73D-Murata-datasheet-165579666.pdf?src-supplier=TME, Height=1mm, Item Type=Capacitor, Length=1.6mm, Manufacturer Part Number=GRM188Z71A106KA73D, Material=4241ConductorMaterial, Pricing="1=0.36, 10=0.155, 50=0.155, 100=0.104, 1000=0.094, 10000=0.065 (USD)", RoHS=Yes, RoHS Compliant=Yes, Stock=390983, Supplier=Mouser, Thickness=800um, Width=800um
C12: library part GJM0335C1H3R5BB01D, "CAP CER 3.5PF 50V C0G/NP0 0201", Manufacturer=Murata, Supplier Part Number=81-GJM0335C1H3R5BB1D, ComponentLink1Description=https://search.murata.co.jp/Ceramy/image/img/A01X/G101/ENG/GJM0335C1H3R5BB01-01.pdf?src-supplier=Digikey, ComponentLink1URL=https://search.murata.co.jp/Ceramy/image/img/A01X/G101/ENG/GJM0335C1H3R5BB01-01.pdf?src-supplier=Digikey, Item Type=Capacitor, Manufacturer Part Number=GJM0335C1H3R5BB01D, Pricing="1=0.1, 10=0.032, 50=0.032, 100=0.019, 1000=0.015, 10000=0.012 (USD)", RoHS=Yes, Stock=31816, Supplier=Mouser
C15 C16 C32: library part GCM0335C1E560JA16D, "CAP CER 56PF 25V C0G/NP0 0201", LCSC Part Number=C5119324, Manufacturer=Murata, Item Type=Capacitors, Manufacturer Part Number=GCM0335C1E560JA16D, Pricing="1=0.1, 10=0.014, 50=0.014, 100=0.008, 1000=0.007, 10000=0.005 (USD)", RoHS=Yes, Stock=29000, Supplier=Mouser
C18 C19 C27: library part CC0402KRX5R6BB475, "CAP CER 4.7UF 10V X5R 0402", Case Code (Imperial)=0402, Case Code (Metric)=1005, LCSC Part Number=C326586, Manufacturer=Yageo, Max Operating Temperature=85°C, Min Operating Temperature=-55°C, Supplier Part Number 1=3871698, Tolerance=10%, Voltage Rating=10V, Capacitance=4.7uF, Case/Package=0402, Category="Ceramic Capacitors", ComponentLink1Description=http://www.yageo.com/documents/recent/UPY-GPHC_X5R_4V-to-50V_25.pdf?src-supplier=Digi-Key, ComponentLink1URL=http://www.yageo.com/documents/recent/UPY-GPHC_X5R_4V-to-50V_25.pdf?src-supplier=Digi-Key, Manufacturer Part Number=CC0402KRX5R6BB475, Mount="Surface Mount", Packaging="Cut Tape", Pricing 1="10000=0.02310, 50000=0.02100 (GBP)", RoHS=Yes, RoHS Compliant=Yes, Stock 1=20000, Supplier 1=Farnell
FB1: "FERRITE BEAD 120 OHM 0402 1LN", Case Code (Imperial)=0402, Case Code (Metric)=1005, LCSC Part Number=C426325, Manufacturer=Murata, Max Current Rating=1.8A, Max Operating Temperature=125°C, Min Operating Temperature=-55°C, Case/Package=0402, ComponentLink1Description=https://www.murata.com/en-us/products/productdata/8796750970910/ENFA0023.pdf?src-supplier=Digikey, ComponentLink1URL=https://www.murata.com/en-us/products/productdata/8796750970910/ENFA0023.pdf?src-supplier=Digikey, Item Type="Ferrite Beads", Manufacturer Part Number=BLM15EX121SN1D, Mounting Technology="Surface Mount", Number of Lines=1, Packaging="Cut Tape", Pricing="1=0.17, 10=0.089, 50=0.089, 100=0.062, 1000=0.045, 10000=0.039 (USD)", RoHS=Yes, RoHS Compliant=Yes, Series="EMIFIL®, BLM15", Stock=26843, Supplier=Mouser
FB2: "FERRITE BEAD 22 OHM 0603 1LN", Case Code (Imperial)=0603, Case Code (Metric)=1608, Manufacturer=Murata, Max Current Rating=6A, Max Operating Temperature=125°C, Min Operating Temperature=-55°C, Supplier Part Number=81-BLM18SD220SN1D, Case/Package=0603, ComponentLink1Description=https://www.murata.com/en-us/products/productdata/8796738650142/ENFA0003.pdf?src-supplier=Digikey, ComponentLink1URL=https://www.murata.com/en-us/products/productdata/8796738650142/ENFA0003.pdf?src-supplier=Digikey, Item Type="Ferrite Beads", Manufacturer Part Number=BLM18SD220SN1D, Mounting Technology="Surface Mount", Number of Lines=1, Packaging="Cut Tape", Pricing="1=0.16, 10=0.093, 50=0.093, 100=0.064, 1000=0.047, 10000=0.04 (USD)", RoHS=Yes, RoHS Compliant=Yes, Series=BLM, Stock=11187, Supplier=Mouser
J1: "CONN U.FL RCPT STR 50 OHM SMD", Case/Package=SMD/SMT, LCSC Part Number=C88374, Manufacturer=Hirose, Package Quantity=10000, Supplier Part Number 1=U.FL-R-SMT-1(80)-CUTT, ComponentLink1Description=https://www.hirose.com/product/en/download_file/key_name/U.FL-R-SMT-1%2880%29/category/Specification%20Sheet/doc_file_id/37638/?file_category_id=9&item_id=03310472280&is_series=&src-supplier=Digi-Key, ComponentLink1URL=https://www.hirose.com/product/en/download_file/key_name/U.FL-R-SMT-1%2880%29/category/Specification%20Sheet/doc_file_id/37638/?file_category_id=9&item_id=03310472280&is_series=&src-supplier=Digi-Key, ComponentLink2Description=http://www.mouser.com/ds/2/185/U.FL_catalog-939761.pdf?src-supplier=Mouser, ComponentLink2URL=http://www.mouser.com/ds/2/185/U.FL_catalog-939761.pdf?src-supplier=Mouser, Item Type="UFL Connector", Lead Free="Lead Free", Manufacturer Part Number=U.FL-R-SMT-1(80), Packaging="Tape and Reel", Pricing 1="1=1.07, 500=0.785, 1500=0.74, 2500=0.72, 5000=0.695 (USD)", Stock 1=1272, Supplier 1="Future Electronics"
J2: "CONN SWF RCPT STR 50 OHM SMD", LCSC Part Number=C167503, Manufacturer=Murata, ComponentLink1Description=https://datasheet.ciiva.com/13541/mm8130-260020datasheet-202944-13541575.pdf?src-supplier=Mouser, ComponentLink1URL=https://datasheet.ciiva.com/13541/mm8130-260020datasheet-202944-13541575.pdf?src-supplier=Mouser, ComponentLink2Description=https://datasheet.ciiva.com/14157/04615200-1-14157602.pdf?src-supplier=Distrelec, ComponentLink2URL=https://datasheet.ciiva.com/14157/04615200-1-14157602.pdf?src-supplier=Distrelec, ComponentLink3Description=https://datasheet.ciiva.com/16465/l0391e-16465766.pdf?src-supplier=Future+Electronics, ComponentLink3URL=https://datasheet.ciiva.com/16465/l0391e-16465766.pdf?src-supplier=Future+Electronics, Item Type="RF / Coaxial Connectors", Manufacturer Part Number=MM8130-2600RA2, Pricing="2000=0.121, 6000=0.118, 8000=0.117, 20000=0.114, 30000=0.111 (USD)", RoHS=Yes, Stock=262000, Supplier="Future Electronics"
J3: "Gold 250V 3A Straight Square Pins 2.5mm 2P 260℃ 6mm -40℃~+105℃ 3mm 2.54mm Plugin Black Brass 1x2P Plugin,P=2.54mm Pin Headers ROHS", LCSC Part Number=C706874, Manufacturer=XKB, Package=Plugin,P=2.54mm, ComponentLink1Description=LCSC, ComponentLink1URL=https://www.lcsc.com/product-detail/Pin-Headers_XKB-Connectivity-X6511WV-02H-C60D30_C706874.html, Item Type="Male Header", Manufacturer Part Number=X6511WV-02H-C60D30
J5: "Pogo Pad 2.5mm 4 Pin", Item Type="Pogo Connector", Manufacturer Part Number="POGO Connector 4 Pin"
J6: "3A Direct Insert Policy 1.7mm 2P 3mm -55℃~+105℃ 2.5mm 1.27mm Single Row Black Brass 1x2P Plugin,P=1.27mm Pin Headers ROHS", LCSC Part Number=C703015, Manufacturer="BOOMELE(BOOM Precision Elec)", Package=Plugin,P=1.27mm, ComponentLink1Description=LCSC, ComponentLink1URL=https://www.lcsc.com/product-detail/Pin-Headers_BOOMELE-Boom-Precision-Elec-1-27-1-2P_C703015.html, Item Type=Male, Manufacturer Part Number=1.27-1*2P
L1: library part LQW15AN68NG00D, "FIXED IND 68NH 140MA 1.96OHM SMD", Case Code (Imperial)=0402, Case Code (Metric)=1005, Current=570mA, DC Current=140mA, DC Resistance (DCR)=1.96R, Inductance Tolerance=2%, LCSC Part Number=C108965, Manufacturer=Murata, Max Operating Temperature=125°C, Min Operating Temperature=-55°C, Package Quantity=1, Self Resonant Frequency=2.5GHz, Test Frequency=100MHz, Case/Package=0402, ComponentLink1Description=https://datasheet.ciiva.com/11799/0900766b8090d800-11799373.pdf?src-supplier=Rs, ComponentLink1URL=https://datasheet.ciiva.com/11799/0900766b8090d800-11799373.pdf?src-supplier=Rs, ComponentLink2Description=https://datasheet.ciiva.com/36857/460962-36857115.pdf?src-supplier=Element14, ComponentLink2URL=https://datasheet.ciiva.com/36857/460962-36857115.pdf?src-supplier=Element14, ComponentLink3Description=https://datasheet.ciiva.com/6709/l0075s0080lqw15a-00-6709896.pdf?src-supplier=Digikey, ComponentLink3URL=https://datasheet.ciiva.com/6709/l0075s0080lqw15a-00-6709896.pdf?src-supplier=Digikey, ComponentLink4Description=https://datasheet.ciiva.com/6709/l0075s0080lqw15a-00-6709895.pdf?src-supplier=Digikey, ComponentLink4URL=https://datasheet.ciiva.com/6709/l0075s0080lqw15a-00-6709895.pdf?src-supplier=Digikey, ComponentLink5Description=https://datasheet.ciiva.com/6709/l0075s0080lqw15a-00-6709898.pdf?src-supplier=Digikey, ComponentLink5URL=https://datasheet.ciiva.com/6709/l0075s0080lqw15a-00-6709898.pdf?src-supplier=Digikey, ComponentLink6Description=https://datasheet.ciiva.com/8508/l0075s0080lqw15a-00-8508445.pdf?src-supplier=Avnet, ComponentLink6URL=https://datasheet.ciiva.com/8508/l0075s0080lqw15a-00-8508445.pdf?src-supplier=Avnet, Core Material=Non-Magnetic,Air,Ferrite, Depth=0.6mm, ESR=1.96R, Height=0.5mm, Item Type=Inductor, Lead Free="Lead Free", Length=1mm, Manufacturer Part Number=LQW15AN68NG00D, Max DC Current=140mA, Military Standard=Not, Mounting Technology="Surface Mount", Packaging="Tape and Reel", Pins=2, Pricing="10000=0.0443, 20000=0.0432, 30000=0.0426, 40000=0.0422, 50000=0.0408 (USD)", Q Factor=20, Radiation Hardening=No, Reach SVHC Compliant=No, RMS Current (Irms)=140mA, RoHS=Yes, RoHS Compliant=Yes, Series=LQW15A_00, Shielding=Unshielded, Stock=10000, Supplier="Future Electronics", Termination=SMD/SMT, Tolerance=2%, Weight=2.8E-05oz, Width=0.5mm
L2: library part LQW15AN9N1G00D, "FIXED IND 9.1NH 540MA 0.14OHM SM", LCSC Part Number=C113122, Manufacturer=Murata, ComponentLink1Description=https://datasheet.ciiva.com/11799/0900766b8090d800-11799088.pdf?src-supplier=Rs, ComponentLink1URL=https://datasheet.ciiva.com/11799/0900766b8090d800-11799088.pdf?src-supplier=Rs, ComponentLink2Description=https://datasheet.ciiva.com/6709/l0075s0080lqw15a-00-6709884.pdf?src-supplier=Digikey, ComponentLink2URL=https://datasheet.ciiva.com/6709/l0075s0080lqw15a-00-6709884.pdf?src-supplier=Digikey, ComponentLink3Description=https://datasheet.ciiva.com/6709/l0075s0080lqw15a-00-6709886.pdf?src-supplier=Digikey, ComponentLink3URL=https://datasheet.ciiva.com/6709/l0075s0080lqw15a-00-6709886.pdf?src-supplier=Digikey, ComponentLink4Description=https://datasheet.ciiva.com/4978/product-4978396.pdf?src-supplier=Mouser, ComponentLink4URL=https://datasheet.ciiva.com/4978/product-4978396.pdf?src-supplier=Mouser, ComponentLink5Description=https://datasheet.ciiva.com/16455/l0075s0080lqw15a-00-16455836.pdf?src-supplier=Future+Electronics, ComponentLink5URL=https://datasheet.ciiva.com/16455/l0075s0080lqw15a-00-16455836.pdf?src-supplier=Future+Electronics, Item Type=nductors, Manufacturer Part Number=LQW15AN9N1G00D, Pricing="10000=0.0438, 20000=0.0428, 30000=0.0422, 40000=0.0418, 50000=0.0404 (USD)", RoHS=Yes, Stock=200000, Supplier="Future Electronics"
L3: library part LQP03HQ1N5B02D, "FIXED IND 1.5NH 1A 50 MOHM SMD", LCSC Part Number=C2041489, Manufacturer=Murata, RMS Current (Irms)=1A, ComponentLink1Description=http://www.farnell.com/datasheets/2616670.pdf?src-supplier=Farnell, ComponentLink1URL=http://www.farnell.com/datasheets/2616670.pdf?src-supplier=Farnell, ComponentLink2Description=https://search.murata.co.jp/Ceramy/image/img/P02/JELF243C-0021.pdf?src-supplier=Digikey, ComponentLink2URL=https://search.murata.co.jp/Ceramy/image/img/P02/JELF243C-0021.pdf?src-supplier=Digikey, ComponentLink3Description=http://search.murata.co.jp/Ceramy/image/img/P02/JELF243C-0021.pdf?src-supplier=Digikey, ComponentLink3URL=http://search.murata.co.jp/Ceramy/image/img/P02/JELF243C-0021.pdf?src-supplier=Digikey, ComponentLink4Description=https://datasheet.octopart.com/LQP03HQ1N5B02D-Murata-datasheet-68295820.pdf?src-supplier=Future+Electronics, ComponentLink4URL=https://datasheet.octopart.com/LQP03HQ1N5B02D-Murata-datasheet-68295820.pdf?src-supplier=Future+Electronics, ComponentLink5Description=http://www.farnell.com/datasheets/2616670.pdf?src-supplier=Newark, ComponentLink5URL=http://www.farnell.com/datasheets/2616670.pdf?src-supplier=Newark, ESR=50mR, Height=420um, Item Type=Inductor, Manufacturer Part Number=LQP03HQ1N5B02D, Pricing="1=0.16, 10=0.104, 50=0.104, 100=0.081, 1000=0.065, 10000=0.057 (USD)", Q Factor=20NUMBER, RoHS=Yes, Stock=37991, Supplier=Mouser
L4: library part LQP03HQ22NH02D, "FIXED IND 22NH 250MA 820MOHM SMD", LCSC Part Number=C1329450, Manufacturer=Murata, ComponentLink1Description=https://datasheet.octopart.com/LQP03HQ22NH02D-Murata-datasheet-140317290.pdf?src-supplier=Farnell, ComponentLink1URL=https://datasheet.octopart.com/LQP03HQ22NH02D-Murata-datasheet-140317290.pdf?src-supplier=Farnell, ComponentLink2Description=https://search.murata.co.jp/Ceramy/image/img/P02/JELF243C-0021.pdf?src-supplier=Digikey, ComponentLink2URL=https://search.murata.co.jp/Ceramy/image/img/P02/JELF243C-0021.pdf?src-supplier=Digikey, ComponentLink3Description=http://search.murata.co.jp/Ceramy/image/img/P02/JELF243C-0021.pdf?src-supplier=Digikey, ComponentLink3URL=http://search.murata.co.jp/Ceramy/image/img/P02/JELF243C-0021.pdf?src-supplier=Digikey, ComponentLink4Description=https://datasheet.octopart.com/LQP03HQ22NH02D-Murata-datasheet-68295820.pdf?src-supplier=Future+Electronics, ComponentLink4URL=https://datasheet.octopart.com/LQP03HQ22NH02D-Murata-datasheet-68295820.pdf?src-supplier=Future+Electronics, ComponentLink5Description=https://datasheet.octopart.com/LQP03HQ22NH02D-Murata-datasheet-142046015.pdf?src-supplier=Arrow.cn, ComponentLink5URL=https://datasheet.octopart.com/LQP03HQ22NH02D-Murata-datasheet-142046015.pdf?src-supplier=Arrow.cn, Item Type=Inductors, Manufacturer Part Number=LQP03HQ22NH02D, Pricing="1=0.11, 10=0.072, 50=0.072, 100=0.056, 1000=0.046, 10000=0.045 (USD)", RoHS=Yes, Stock=18723, Supplier=Mouser
L5 L6: library part CIGT201610EH2R2MNE, "FIXED IND 2.2UH 2.5A 87MOHM SMD", Case Code (Imperial)=0806, Case Code (Metric)=2016, DC Resistance (DCR)=87mR, Manufacturer=Samsung, Max Operating Temperature=125°C, Min Operating Temperature=-40°C, Saturation Current=2.9A, Test Frequency=1MHz, Tolerance=20%, Case/Package=0806, ComponentLink1Description=http://www.samsungsem.com/kr/support/product-search/inductor/CIGT201610EH2R2MNE.jsp?src-supplier=Digikey, ComponentLink1URL=http://www.samsungsem.com/kr/support/product-search/inductor/CIGT201610EH2R2MNE.jsp?src-supplier=Digikey, Core Material=Metal,Composite, Item Type=Inductor, Manufacturer Part Number=CIGT201610EH2R2MNE, Mounting Technology="Surface Mount", Packaging="Cut Tape", Pricing="60000=0.0753, 99000=0.0745 (USD)", RoHS=Yes, RoHS Compliant=Yes, Series=CIGT, Shielding=Unshielded, Stock=6000, Supplier="Arrow Electronics", Supplier Part Number=CIGT201610EH2R2MNE
LED1: "LED GREEN CLEAR CHIP SMD", Case Code (Imperial)=0402, Case Code (Metric)=1005, Color=Green, Forward Voltage=2.1V, Lens Color=Colorless, Manufacturer=SunLED, Supplier Part Number 1=1497-1219-6-ND, Test Current=20mA, Case/Package=0402, ComponentLink1Description=http://www.sunledusa.com/products/spec/XZVG68W-2.pdf?src-supplier=Digi-Key, ComponentLink1URL=http://www.sunledusa.com/products/spec/XZVG68W-2.pdf?src-supplier=Digi-Key, ComponentLink2Description=https://www.sunledusa.com/products/spec/XZVG68W-2.pdf?src-supplier=Digi-Key, ComponentLink2URL=https://www.sunledusa.com/products/spec/XZVG68W-2.pdf?src-supplier=Digi-Key, Dominant Wavelength=570nm, Height=0.6mm, Item Type=LED, Length=1mm, Lens Transparency=Clear, Luminous Intensity=49mcd, Manufacturer Part Number=XZVG68W-2, Mount="Surface Mount", Packaging="Tape and Reel", Pricing 1="1=0.5, 10=0.36, 100=0.16, 500=0.112, 1000=0.092 (USD)", Stock 1=4185, Supplier 1=Digi-Key, Viewing Angle=120°, Width=0.5mm
LED2: library part XZMDK68W-2, "LED RED CLEAR CHIP SMD", Case Code (Imperial)=0402, Case Code (Metric)=1005, Color=Red, Forward Voltage=1.95V, Lens Color=Colorless, Manufacturer=SunLED, Supplier Part Number 1=1497-1174-6-ND, Test Current=20mA, Case/Package=0402, ComponentLink1Description=http://www.sunledusa.com/products/spec/XZMDK68W-2.pdf?src-supplier=Digi-Key, ComponentLink1URL=http://www.sunledusa.com/products/spec/XZMDK68W-2.pdf?src-supplier=Digi-Key, ComponentLink2Description=https://www.sunledusa.com/products/spec/XZMDK68W-2.pdf?src-supplier=Digi-Key, ComponentLink2URL=https://www.sunledusa.com/products/spec/XZMDK68W-2.pdf?src-supplier=Digi-Key, Dominant Wavelength=630nm, Height=0.6mm, Item Type=LED, Length=1mm, Lens Transparency=Clear, Luminous Intensity=69mcd, Manufacturer Part Number=XZMDK68W-2, Mount="Surface Mount", Packaging="Tape and Reel", Pricing 1="1=0.43, 10=0.306, 100=0.136, 500=0.0952, 1000=0.0782 (USD)", Stock 1=69539, Supplier 1=Digi-Key, Viewing Angle=120°, Width=0.5mm
LED3: library part XZMDK68W-2, "LED RED CLEAR CHIP SMD", Case Code (Imperial)=0402, Case Code (Metric)=1005, Forward Voltage=1.95V, Lens Color=Colorless, Manufacturer=SunLED, Supplier Part Number 1=1497-1174-6-ND, Test Current=20mA, Case/Package=0402, Color=Red, ComponentLink1Description=http://www.sunledusa.com/products/spec/XZMDK68W-2.pdf?src-supplier=Digi-Key, ComponentLink1URL=http://www.sunledusa.com/products/spec/XZMDK68W-2.pdf?src-supplier=Digi-Key, ComponentLink2Description=https://www.sunledusa.com/products/spec/XZMDK68W-2.pdf?src-supplier=Digi-Key, ComponentLink2URL=https://www.sunledusa.com/products/spec/XZMDK68W-2.pdf?src-supplier=Digi-Key, Dominant Wavelength=630nm, Height=0.6mm, Item Type=LED, Length=1mm, Lens Transparency=Clear, Luminous Intensity=69mcd, Manufacturer Part Number=XZMDK68W-2, Mount="Surface Mount", Packaging="Tape and Reel", Pricing 1="1=0.43, 10=0.306, 100=0.136, 500=0.0952, 1000=0.0782 (USD)", Stock 1=69539, Supplier 1=Digi-Key, Viewing Angle=120°, Width=0.5mm
Q1: "MOSFET N/P-CH 20V SOT563", Case/Package=SOT-563, Continuous Drain Current (ID)=1.03A, Drain to Source Voltage (Vdss)=20V, Drain-source On Resistance-Max=970mR, Input Capacitance=37.1pF, LCSC Part Number=8027555, Manufacturer=Diodes, Max Operating Temperature=150°C, Max Power Dissipation=450mW, Min Operating Temperature=-55°C, ComponentLink1Description=https://datasheet.ciiva.com/11176/dmc2400uv-11176335.pdf?src-supplier=Avnet, ComponentLink1URL=https://datasheet.ciiva.com/11176/dmc2400uv-11176335.pdf?src-supplier=Avnet, FET Type="N and P-Channel", Height=0.6mm, Item Type=MOSFETs, Lead Free="Lead Free", Length=1.7mm, Manufacturer Part Number=DMC2400UV-7, Mounting Technology="Surface Mount", Packaging="Tape and Reel", Pins=6, Pricing="3000=0.0517, 9000=0.0497, 12000=0.0492, 30000=0.0476, 45000=0.046 (USD)", Radiation Hardening=No, Rds On Max=480mR, Reach SVHC Compliant=Yes, RoHS=Yes, RoHS Compliant=Yes, Series=-, Stock=207000, Supplier="Future Electronics", Turn-Off Delay Time=13.74ns, Turn-On Delay Time=4.06ns, Width=1.25mm
Q2: "MOSFET N-CH 20V 1A DFN1006-3", Drain to Source Resistance=340mR, LCSC Part Number=C570828, Manufacturer=Rohm, ComponentLink1Description=http://www.mouser.com/ds/2/348/rv2c010un-e-1139137.pdf?src-supplier=Mouser, ComponentLink1URL=http://www.mouser.com/ds/2/348/rv2c010un-e-1139137.pdf?src-supplier=Mouser, ComponentLink2Description=http://www.farnell.com/datasheets/1945594.pdf?src-supplier=Farnell, ComponentLink2URL=http://www.farnell.com/datasheets/1945594.pdf?src-supplier=Farnell, ComponentLink3Description=https://www.rohm.com/datasheet/RV2C010UN/rv2c010un-e?src-supplier=Digikey, ComponentLink3URL=https://www.rohm.com/datasheet/RV2C010UN/rv2c010un-e?src-supplier=Digikey, ComponentLink4Description=http://rohmfs.rohm.com/en/techdata_basic/transistor/taping/VML1006_T2L_taping.pdf?src-supplier=Digikey, ComponentLink4URL=http://rohmfs.rohm.com/en/techdata_basic/transistor/taping/VML1006_T2L_taping.pdf?src-supplier=Digikey, ComponentLink5Description=http://rohmfs.rohm.com/en/products/databook/datasheet/discrete/transistor/mosfet/rv2c010unt2l.pdf?src-supplier=Avnet, ComponentLink5URL=http://rohmfs.rohm.com/en/products/databook/datasheet/discrete/transistor/mosfet/rv2c010unt2l.pdf?src-supplier=Avnet, ComponentLink6Description=https://datasheet.octopart.com/RV2C010UNT2L-Rohm-datasheet-57364635.pdf?src-supplier=Element14, ComponentLink6URL=https://datasheet.octopart.com/RV2C010UNT2L-Rohm-datasheet-57364635.pdf?src-supplier=Element14, Item Type=MOSFETs, Manufacturer Part Number=RV2C010UNT2L, Pricing="1=0.42, 10=0.261, 50=0.261, 100=0.123, 1000=0.086, 10000=0.073 (USD)", RoHS=Yes, Stock=16470, Supplier=Mouser
Q3: "MOSFET 2N-CH 30V 0.5A SOT563", Manufacturer=MCC, Supplier Part Number=353-UM6X1NA-TPCT-ND, Item Type=Mosfet, Manufacturer Part Number=UM6X1NA-TP, Pricing="1=0.29, 10=0.203, 100=0.1284, 500=0.08108, 1000=0.06082 (USD)", RoHS=No, Stock=4780, Supplier=Digikey
R1 R5: library part RC0201FR-0710KL, "RES SMD 10K OHM 1% 1/20W 0201", LCSC Part Number=C106225, Manufacturer=Yageo, Package=0201, ComponentLink7Description=LCSC, ComponentLink7URL=https://www.lcsc.com/product-detail/Chip-Resistor-Surface-Mount_YAGEO-RC0201FR-0710KL_C106225.html, Item Type=Resistor, Manufacturer Part Number=RC0201FR-0710KL
R2 R27: library part RC0201JR-070RL, "RES SMD 0 OHM JUMPER 1/20W 0201", Case Code (Imperial)=0201, Case Code (Metric)=0603, LCSC Part Number=C106228, Manufacturer=Yageo, Max Operating Temperature=125°C, Max Power Dissipation=50mW, Min Operating Temperature=-55°C, Package Quantity=10000, Resistance=0R, Resistance Tolerance=5%, Resistor Type="Thick Film", Supplier Part Number 1=311-0.0NCT-ND, Voltage Rating=25V, Case/Package=0201, Category="Chip SMD Resistors", ComponentLink1Description=https://datasheet.ciiva.com/7672/1563626-7672247.pdf?src-supplier=Element14, ComponentLink1URL=https://datasheet.ciiva.com/7672/1563626-7672247.pdf?src-supplier=Element14, ComponentLink2Description=https://datasheet.ciiva.com/7660/1421516-7660808.pdf?src-supplier=Element14, ComponentLink2URL=https://datasheet.ciiva.com/7660/1421516-7660808.pdf?src-supplier=Element14, ComponentLink3Description=https://datasheet.ciiva.com/7672/1563626-7672248.pdf?src-supplier=Element14, ComponentLink3URL=https://datasheet.ciiva.com/7672/1563626-7672248.pdf?src-supplier=Element14, ComponentLink4Description=https://datasheet.ciiva.com/16855/pyu-rc0201-51-rohs-l-8-16855994.pdf?src-supplier=Avnet+Europe, ComponentLink4URL=https://datasheet.ciiva.com/16855/pyu-rc0201-51-rohs-l-8-16855994.pdf?src-supplier=Avnet+Europe, ComponentLink5Description=https://datasheet.ciiva.com/28419/pyu-rc0201-51-rohs-l-8-28419660.pdf?src-supplier=Avnet+Europe, ComponentLink5URL=https://datasheet.ciiva.com/28419/pyu-rc0201-51-rohs-l-8-28419660.pdf?src-supplier=Avnet+Europe, ComponentLink6Description=https://datasheet.ciiva.com/46391/1421516-46391340.pdf?src-supplier=Element14, ComponentLink6URL=https://datasheet.ciiva.com/46391/1421516-46391340.pdf?src-supplier=Element14, ComponentLink7Description=https://datasheet.ciiva.com/8896/pyu-rc0201-51-rohs-l-8-8896143.pdf?src-supplier=Avnet, ComponentLink7URL=https://datasheet.ciiva.com/8896/pyu-rc0201-51-rohs-l-8-8896143.pdf?src-supplier=Avnet, Construction=Rectangular, Contact Plating=Tin,Matte, Depth=0.3mm, Features="Moisture Resistant", Height=0.01inch, Lead Free="Lead Free", Length=0.6mm, Manufacturer Part Number=RC0201JR-070RL, Military Standard=Not, Number of Terminations=2, Packaging="Tape and Reel", Power Rating=50mW, Pricing 1="1=0.10000, 10=0.03600, 25=0.02640, 50=0.02000, 100=0.01480, 250=0.01128, 500=0.00904, 1000=0.00665, 5000=0.00477 (USD)", Radiation Hardening=No, REACH SVHC=Unknown, RoHS=Yes, RoHS Compliant=Yes, Series=RC, Size Code=0201, Stock 1=11079, Supplier 1=Digi-Key, Termination=SMD/SMT, Tolerance=5%, Voltage Rating (DC)=25V, Weight=6E-06oz, Width=0.012inch
R3 R20 R23 R25 R39: library part RC0402FR-070RL, "RES 0 OHM JUMPER 1/16W 0402", Case Code (Imperial)=0402, Case Code (Metric)=1005, LCSC Part Number=C106231, Manufacturer=Yageo, Max Operating Temperature=155°C, Max Power Dissipation=63mW, Min Operating Temperature=-55°C, Power Rating=62.5mW, Resistor Type="Thick Film", Supplier Part Number 1=603-RC0402FR-070RL, Temperature Coefficient=200ppm/°C, Tolerance=1%, Voltage Rating=50V, Case/Package=0402, ComponentLink1Description=https://datasheet.ciiva.com/8896/pyu-rc0402-51-rohs-l-6-8896149.pdf?src-supplier=Avnet, ComponentLink1URL=https://datasheet.ciiva.com/8896/pyu-rc0402-51-rohs-l-6-8896149.pdf?src-supplier=Avnet, ComponentLink2Description=https://datasheet.ciiva.com/16790/pyu-rc0402-51-rohs-l-6-r-16790444.pdf?src-supplier=Future+Electronics, ComponentLink2URL=https://datasheet.ciiva.com/16790/pyu-rc0402-51-rohs-l-6-r-16790444.pdf?src-supplier=Future+Electronics, Contact Plating=Tin,Matte, Features="Moisture Resistant", Height=0.35mm, Item Type=Resistors, Lead Free="Lead Free", Length=1mm, Manufacturer Part Number=RC0402FR-070RL, Mount="Surface Mount", Number of Terminations=2, Packaging="Tape and Reel", Pricing 1="1=0.10000, 10=0.01400, 50=0.01400, 100=0.00600, 1000=0.00300, 5000=0.00200, 10000=0.00100 (USD)", Radiation Hardening=No, Resistance=0R, RoHS=Yes, RoHS Compliant=Yes, Series=RC, Size Code=0402, Stock 1=8556842, Supplier 1=Mouser, Termination=SMD/SMT, Width=0.5mm